# Altium PCB PCB1.PcbDoc (part 2 of 2)
Units mm, origin at the board's own origin, x right, y up, seen from the top; angles counter-clockwise.
Board outline 20 x 95 mm, 4 copper layers (Top Layer, Inner Layer 1, Inner Layer 2, Bottom Layer), stack 1.586 mm thick; 102 components, 66 nets, 399 pads, 49 vias.
Unrouted connection lines stored in the file: 134.
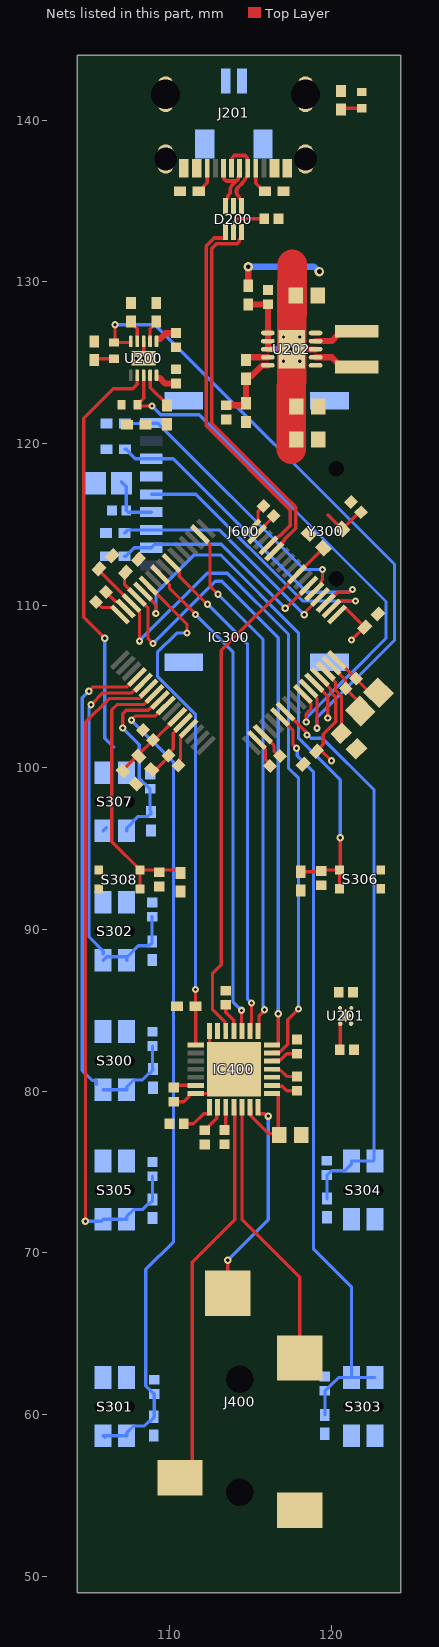
[diagram p3: the nets of this part, all layers, seen from the top]

## Part data (continued)
U202: library part CMP-0349-00001-1, "Buck-Boost Voltage Converter with 1.8 to 5.5 V Input and 1.2 to 5.5 V Output, -40 to 85 degC, 10-Pin SON (DRC), Green (RoHS & no Sb/Br)", Dynamic Voltage Scaling=TRUE, manufacturer="Texas Instruments", Switching Frequency(Max)(kHz)=1500, componentlink1description=Datasheet, componentlink1url=http://www.ti.com/general/docs/lit/getliterature.tsp?genericPartNumber=TPS63000&fileType=pdf, componentlink2description="Package Specification", componentlink2url=http://www.ti.com/litv/pdf/mpds117k, DatasheetVersion=SLVS520B, Eco-Plan="Green (RoHS & no Sb/Br)", Iout(Max)(A)=1.2, Iq(Typ)(mA)=0.04, Mounting Technology="Surface Mount", PackageDescription="10-Pin Plastic Small Outline No-Lead, 3 x 3 x 1 mm Body, 0.5 mm Pitch, Exposed Pad", PackageReference=DRC10-2400X1650TP, PackageVersion="revL, Sep-2011", PartNumber=TPS63000DRCRG4, Regulated Outputs(#)=1, SubFamily="Buck-Boost Regulator", Synchronous Rectification=TRUE, Topology=Buck-Boost, Vin(Max)(V)=5.5, Vin(Min)(V)=1.8, Vout(Max)(V)=5.5, Vout(Min)(V)=1.2
Y300: "22.5792 MHz XO (Standard) CMOS Oscillator 1.71V ~ 3.63V Enable/Disable 4-VLGA", Current Supply (Max)="1.3mA (Typ)", Frequency="22.5792 MHz", Frequency Stability=±25ppm, Operating Temperature="-40°C ~ 85°C", Package / Case=4-VLGA, Supplier Device Package="4-VLGA (2.5x2)", Voltage - Supply="1.71V ~ 3.63V", Base Resonator=MEMS, componentlink1description=Datasheet, componentlink1url=https://ww1.microchip.com/downloads/aemDocuments/documents/TCG/ProductDocuments/DataSheets/DSC60xxB-Ultra-Small-Ultra-Low-Power-MEMS-Oscillator-DS20006133.pdf, componentlink2description=DigiKey, componentlink2url=https://www.digikey.ca/en/products/detail/microchip-technology/DSC6001JI2B-022-5792T/22212139, Function=Enable/Disable, Height - Seated (Max)="0.035\" (0.89mm)", Mounting Type="Surface Mount", Output=CMOS, Size / Dimension="0.098\" L x 0.079\" W (2.50mm x 2.00mm)", Supplier 1=Avnet, Supplier Part Number 1=DSC6001JI2B-022.5792T, TYPE="XO (Standard)"

## Free pads (board coordinates)
  rrect100% 1x1.8 hole 1.4 slot 0.6 at 0 deg paste-2539.97 mask+0: 1(118.401,137.592) 2(109.761,137.592)
  rrect100% 1x2.2 hole 1.8 slot 0.6 at 0 deg paste-2539.97 mask+0: 3(118.401,141.592) 4(109.761,141.592)
  rect 0.6x1.15 smd paste+0 mask+0: A1-B12(117.281,137.017) A4-B9(116.481,137.017) B1-A12(110.881,137.017) B4-A9(111.681,137.017)
  rect 0.3x1.15 smd paste+0 mask+0: A5(115.331,137.017) A6(114.331,137.017) A7(113.831,137.017) A8(112.831,137.017) B5(112.331,137.017) B6(113.331,137.017) B7(114.831,137.017) B8(115.831,137.017)

## Via types
v1: diameter 0.45, hole 0.2, Top Layer to Bottom Layer, 42 vias
v2: diameter 0.5, hole 0.2, Top Layer to Bottom Layer, 5 vias
v3: diameter 0.6, hole 0.3, Top Layer to Bottom Layer, 2 vias

## Nets (pads, with @x,y where several pads share a name; then routed paths per layer and width w, separated by ;. In a path a pad name is that pad's centre, name@x,y a point inside that pad or via, vN(x,y) a via of type N, cw(c..) or ccw(c..) an arc to the next point about the centre after c; other vN are vias at no path point)
AGND: C203.1 C204.1 C404.2 C405.2 C406.2 C407.2 IC400.7 IC400.14 IC400.29 J400.1 NT400.2 U201.2 U201.5 | length 7.6
  Top Layer w0.2: C407.2@110.25,79.335 110.87,79.335 111.225,79.69 111.225,79.8 111.275,79.85 IC400.14@111.625,79.85 112.475,79.85 IC400.29@113.975,81.35 112.475,82.85 IC400.7@112.475,83.7
AVDD_3V: C204.2 C400.1 C406.1 IC400.17 IC400.26 U201.1 | length 4.8
  Top Layer w0.2: IC400.17@113.475,79 113.475,77.59 C406.1@113.525,77.54 ; IC400.26@116.325,81.85 116.375,81.9 116.855,81.9 117.255,82.3 C400.1@117.875,82.3 ; C204.2@120.52,82.55 120.555,82.585 U201.1@120.555,84.16
BOOT0: C313.1 IC300.60 R309.2 S306.1 S306.2 | length 34.1
  Top Layer w0.2: IC300.60@108.355,110.85 109.157,110.048 v1(109.157,109.505) ; R309.2@118.1,93.55 119.335,93.55 C313.1@119.375,93.59 119.44,93.655 S306.1@120.5,93.655 ; S306.2@120.5,92.495 S306.1@120.5,93.655 ; v1@120.6,95.7 v1(120.552,95.652) 120.552,93.707 S306.1@120.5,93.655
  Bottom Layer w0.2: v1(109.157,109.505) 109.157,110.757 111.525,113.125 113.15,113.125 117.975,108.3 117.975,101.8 120.552,99.223 v1(120.552,95.652)
C1N: C502.1 J500.4 | length 4.9
  Bottom Layer w0.2: J500.4@136.555,64.625 136.555,66.719 137.075,67.239 137.075,68.1 137.5,68.525 137.5,68.575 137.85,68.925 C502.1@137.9,68.925
C1P: C502.2 J500.3 | length 3.3
  Bottom Layer w0.2: J500.3@137.175,64.625 137.235,64.685 137.235,66.16 137.9,66.825 C502.2@137.9,67.575
C2N: C500.2 J500.2 | length 5.1
  Bottom Layer w0.2: J500.2@137.795,64.625 137.855,64.685 137.855,65.92 138.714,66.779 138.714,67.939 139.225,68.45 139.225,68.575 139.575,68.925 C500.2@139.625,68.925
C2P: C500.1 J500.1 | length 3
  Bottom Layer w0.2: J500.1@138.415,64.625 138.415,65.715 139.55,66.85 C500.1@139.55,67.15
CC1: pad.A5 R201.2 | length 1.7
  Top Layer w0.2: pad.A5@115.331,137.017 115.331,136.098 115.827,135.602 R201.2@115.902,135.602
CC2: pad.B5 R202.2 | length 1.7
  Top Layer w0.2: R202.2@111.802,135.602 111.877,135.602 112.077,135.802 112.077,135.877 112.331,136.131 pad.B5@112.331,137.017
CCW: C305.1 IC300.22 R303.1 S303.1 S303.3 | length 47.6
  Top Layer w0.2: IC300.22@116.823,103.109 117.625,102.307 117.625,101.426 117.848,101.203 v1(117.848,101.184)
  Bottom Layer w0.2: v1(117.848,101.184) 117.895,101.136 117.895,100.705 118.9,99.7 118.9,70.218 121.25,67.868 S303.1@121.25,62.3 ; R303.1@119.6,59.975 C305.1@119.6,61.475 119.62,61.475 119.998,61.853 120.004,61.853 120.45,62.3 S303.1@121.25,62.3 ; S303.3@122.7,62.3 S303.1@121.25,62.3
CLK_22_5792M: IC300.40 IC400.5 Y300.3 | length 32.7
  Top Layer w0.2: IC400.5@113.475,83.7 113.425,83.75 113.425,84.275 112.65,85.05 112.65,87.25 113.2,87.8 113.2,107.223 117.884,111.907 IC300.40@117.884,111.931 119.275,113.321 Y300.3@119.275,113.35
CW: C301.1 IC300.9 R301.1 S301.1 S301.3 | length 51.5
  Top Layer w0.2: v1@107.617,102.925 107.867,103.175 109.111,103.175 109.752,103.816 IC300.9@109.769,103.816
  Bottom Layer w0.2: S301.3@106,58.6 S301.3@105.9,58.7 S301.1@107.35,58.7 107.35,58.875 107.775,59.3 108.45,59.3 108.75,59.6 108.825,59.6 109.025,59.8 R301.1@109.025,59.875 109.05,59.9 C301.1@109.05,61.285 109.03,61.285 108.675,61.64 108.67,61.64 108.528,61.781 108.528,68.978 110.25,70.7 110.25,100.313 v1(107.644,102.919)
D_IN_N: D200.1 pad.A7 pad.B7 | length 5.1
  Top Layer w0.224: pad.A7@113.831,137.017 113.869,137.055 113.869,137.674 114,137.805 114.662,137.805 114.793,137.674 114.793,137.055 pad.B7@114.831,137.017 114.793,136.554 114.666,136.335 cw(c114.481,136.442) 114.653,136.316 114.502,136.111 cw(c114.04,136.452) 114.448,136.048 114.365,135.965 114.204,135.804 ccw(c114.362,135.646) 114.138,135.646 114.138,135.53 ccw(c114.362,135.53) 114.204,135.372 114.25,135.326 114.315,135.26 114.315,135.159 114.452,135.022 D200.1@114.452,134.677
D_IN_P: D200.3 pad.A6 pad.B6 | length 4.1
  Top Layer w0.224: pad.B6@113.331,137.017 113.369,136.979 113.369,136.36 113.5,136.229 114.101,136.229 ; D200.3@113.452,134.677 113.452,135.022 113.589,135.159 113.589,135.26 113.746,135.488 113.746,135.558 ; 113.746,135.559 113.744,135.592 cw(c114.265,135.623) 113.896,135.992 114.117,136.213 114.198,136.294 ccw(c114.04,136.452) 114.258,136.402 114.293,136.554 pad.A6@114.331,137.017
DGND: C200.2 C201.1 C202.1 C209.1 C300.2 C301.2 C302.1 C303.2 C304.2 C305.2 C306.1 C307.2 C308.2 C309.2 C310.1 C311.1 C312.2 C313.2 C314.1 C315.2 C316.2 C317.2 C400.2 C402.2 C403.2 C501.2 C503.2 C504.1 C505.2 C600.1 C601.2 D200.2 D201.C IC300.12 IC300.18 IC300.31 IC300.47 IC300.63 IC400.6 IC400.24 J201.2 J201.3 J201.4 J500.7 J600.6 J600.10 J600.11 J600.12 J600.13 NT200.2 NT400.1 pad.1 pad.2 pad.3 pad.4 pad.A1-B12 pad.B1-A12 R201.1 R202.1 R203.1 R205.1 R206.1 R210.1 R305.1 R309.1 R502.1 S300.2 S300.4 S301.2 S301.4 S302.2 S302.4 S303.2 S303.4 S304.2 S304.4 S305.2 S305.4 S307.2 S307.4 S308.1 S308.2 U200.3 U200.11 U202.9 Y300.2 | length 15.2
  Top Layer w0.2: C302.1@105.95,110.725 106.175,110.725 106.675,110.225 106.879,110.225 IC300.63@107.295,109.809 ; v1(108.4,125.275) U200.3@108.4,126.325 ; R305.1@108.982,99.918 109.21,99.918 109.939,100.647 109.939,100.875 110.225,101.161 110.225,102.11 110.83,102.716 IC300.12@110.83,102.755 ; C403.2@113.415,86.265 C403.2@113.475,86.205 ; IC300.18@115.409,101.695 115.409,101.624 115.925,101.108 115.925,100.508 116.199,100.234 C311.1@116.199,100.071 ; IC300.47@115.409,114.405 115.409,114.459 116.486,115.536 C303.2@116.486,115.589 ; IC300.31@120.005,106.291 120.875,105.421 120.875,104.878 C309.2@120.889,104.864 121.784,103.968 C310.1@121.784,103.484
  Top Layer w0.381: R210.1@114.724,125.166 114.898,125.34 U202.9@116.075,125.34 ; R201.1@117.052,135.602 R201.1@117.127,135.602
  other v1: 107.925,125.275 108.875,125.275
DVDD_3V3: C203.2 C206.1 C207.2 C208.2 C302.2 C303.1 C307.1 C309.1 C310.2 C311.2 C314.2 C316.1 C403.1 C501.1 C503.1 C600.2 C601.1 IC300.13 IC300.19 IC300.30 IC300.32 IC300.48 IC300.64 IC400.4 J500.5 J500.8 J600.4 R204.1 R207.1 R209.2 R300.2 R301.2 R302.2 R303.2 R306.2 R307.2 R308.2 R310.2 R400.1 R401.2 R402.2 R500.1 R501.1 R600.2 R601.2 R602.2 R603.2 S306.3 S306.4 U201.3 U201.4 U202.1 Y300.1 Y300.4 | length 30.3
  Top Layer w0.2: C302.2@105.328,110.103 105.464,110.103 105.611,110.103 105.842,109.871 106.526,109.871 IC300.64@106.941,109.456 ; C307.1@110.561,100.114 110.561,100.397 110.668,100.504 110.668,100.557 110.686,100.575 110.686,101.833 111.184,102.331 IC300.13@111.184,102.402 ; C403.1@113.475,85.568 C403.1@113.475,85.325 113.475,84.875 113.975,84.375 IC400.4@113.975,83.7 ; IC300.48@115.056,114.759 115.471,115.174 115.471,115.818 C303.1@115.864,116.211 ; IC300.19@115.763,102.048 116.45,101.361 116.45,101.033 116.79,100.693 C311.2@116.821,100.693 ; IC300.30@119.652,105.937 119.652,105.866 120.249,105.27 120.249,104.779 120.628,104.4 120.628,103.436 120.633,103.431 120.633,102.313 C314.2@120.558,102.238 ; Y300.1@119.783,115.601 Y300.4@120.667,114.717 C316.1@121.775,115.825 ; IC300.32@120.359,106.644 122.388,104.616 C310.2@122.916,104.616
  Bottom Layer w0.2: C600.2@107.025,117.65 107.33,117.345 C601.1@107.33,115.875 107.435,115.77 J600.4@108.88,115.77 ; J500.8@134.055,64.35 134.055,67.205 134.275,67.425 C501.1@134.305,67.425 ; J500.5@135.935,64.625 135.935,66.91 136.2,67.175 C503.1@136.2,67.65
HOME: C315.1 IC300.8 R308.1 S307.1 S307.3 | length 11.9
  Top Layer w0.2: v1(107.105,102.43) 107.105,103.305 107.322,103.522 108.698,103.522 109.345,104.169 IC300.8@109.416,104.169
  Bottom Layer w0.2: S307.3@105.9,96.075 S307.3@106.1,96.275 ; v1(107.105,102.43) 108.125,101.409 108.125,99.325 108.42,99.03 108.425,99.03 108.78,98.675 C315.1@108.8,98.675 108.8,97.303 R308.1@108.858,97.244 108.858,97.169 108.658,96.969 108.069,96.969 107.35,96.25 S307.1@107.35,96.075
HPLEFT: IC400.19 J400.2 | length 17
  Top Layer w0.2: IC400.19@114.475,79 114.475,72.075 118.05,68.5 J400.2@118.05,63.5
HPRIGHT: IC400.18 J400.3 | length 23.3
  Top Layer w0.2: J400.3@111.4,56.85 111.4,69.425 114.025,72.05 114.025,78.95 IC400.18@113.975,79
HPSENSE: IC400.21 J400.4 | length 13
  Top Layer w0.2: J400.4@113.6,67.5 v1(113.6,69.55) ; IC400.21@115.475,79 115.475,78.65 115.525,78.6 115.882,78.6 116.032,78.45 v1(116.1,78.45)
  Bottom Layer w0.2: v1(113.6,69.55) 116.1,72.05 v1(116.1,78.45)
IREF: J500.12 R502.2 | length 3.2
  Bottom Layer w0.2: J500.12@131.575,64.895 131.575,65.44 132.825,66.69 132.825,67.275 R502.2@133.025,67.475
MODE: C317.1 IC300.23 R310.1 S304.1 S304.3 | length 35.3
  Top Layer w0.2: IC300.23@117.177,103.462 117.177,103.434 118.5,102.111 v1(118.5,102)
  Bottom Layer w0.2: v1(118.5,102) 118.542,102 118.742,101.8 119.45,101.8 122.635,98.615 122.635,75.71 122.6,75.675 S304.1@121.25,75.675 121.25,75.5 120.825,75.075 120.01,75.075 119.745,74.81 C317.1@119.725,74.81 R310.1@119.725,73.35
NetC206_2: C206.2 R209.1 R210.2 U202.10 | length 4.5
  Top Layer w0.381: C206.2@113.528,122.372 114.615,122.372 114.724,122.482 R209.1@114.724,122.499 114.724,124.091 114.834,124.201 115.081,124.201 115.72,124.84 U202.10@116.075,124.84
NetC209_2: C209.2 R208.1 U202.6 U202.7 U202.8 | length 4
  Top Layer w0.381: R208.1@114.86,128.605 114.865,128.61 C209.2@116.08,128.61 ; U202.8@116.075,125.84 116.08,125.845 C209.2@116.08,128.61 ; C209.2@116.08,128.61 C209.2@116.085,128.615 C209.2@116.08,128.61
NetC306_2: C306.2 IC300.11 R304.1 R305.2 | length 4.8
  Top Layer w0.2: R304.1@107.118,99.782 107.118,99.821 108.11,100.813 C306.2@108.986,101.689 ; C306.2@109.009,101.641 IC300.11@110.477,103.109
NetC401_1: C401.1 IC400.25 | length 1.7
  Top Layer w0.2: IC400.25@116.325,81.35 116.375,81.3 116.855,81.3 117.255,80.9 C401.1@117.875,80.9
NetC401_2: C401.2 IC400.23 | length 1.7
  Top Layer w0.2: IC400.23@116.325,80.35 116.375,80.3 116.975,80.3 117.255,80.02 C401.2@117.875,80.02
NetC402_1: C402.1 IC400.20 IC400.22 | length 5.6
  Top Layer w0.2: IC400.20@114.975,79 115.025,78.95 115.025,78.475 116.13,77.37 116.695,77.37 116.725,77.34 116.725,79.8 116.675,79.85 IC400.22@116.325,79.85
NetC404_1: C404.1 IC400.15 | length 2.2
  Top Layer w0.2: C404.1@110.88,77.975 111.48,77.975 112.105,78.6 112.425,78.6 112.475,78.65 IC400.15@112.475,79
NetC405_1: C405.1 IC400.16 | length 1.8
  Top Layer w0.2: C405.1@112.175,77.58 112.195,77.58 112.395,77.78 112.395,77.8 112.925,78.33 112.925,78.95 IC400.16@112.975,79
NetC407_1: C407.1 IC400.13 | length 1.4
  Top Layer w0.2: C407.1@110.25,80.215 110.385,80.35 IC400.13@111.625,80.35
NetD201_A: D201.A R200.2 | length 1.3
  Top Layer w0.2: R200.2@120.6,140.65 120.675,140.725 D201.A@121.875,140.725
NetD202_A: D202.A R204.2 | length 0.1
  Top Layer w0.2: R204.2@107.35,121.175 R204.2@107.425,121.1
NetD202_C: D202.C IC300.26 U200.8 | length 33.9
  Top Layer w0.2: D202.C@108,122.4 108.4,122.8 U200.8@108.4,124.225 ; D202.C@108.025,122.4 108.091,122.334 v1(108.912,122.334) ; IC300.26@118.238,104.523 118.238,104.452 118.737,103.953 118.737,103.587 118.45,103.3 v1(118.45,102.8)
  Bottom Layer w0.2: v1(108.912,122.334) 109.464,121.782 111.843,121.782 123.375,110.25 123.375,107.975 121.282,105.882 121.282,105.866 121.164,105.748 121.148,105.748 118.496,103.096 118.496,102.846 v1(118.45,102.8)
NetD203_A: D203.A R207.2 | length 1.3
  Top Layer w0.2: R207.2@105.35,125.175 105.425,125.25 D203.A@106.575,125.25
NetD203_C: D203.C IC300.27 U200.5 | length 40.4
  Top Layer w0.2: v1(106.625,127.35) 106.625,126.3 D203.C@106.575,126.25 107.585,126.25 107.6,126.265 U200.5@107.6,126.325 ; IC300.27@118.591,104.877 118.591,104.806 119.11,104.287 v1(119.11,102.425)
  Bottom Layer w0.2: v1(106.625,127.35) 109.1,127.35 123.9,112.55 123.9,107.85 119.11,103.06 v1(119.11,102.425)
NetIC300_28: IC300.28 J500.9 | length 2.5
  Top Layer w0.2: IC300.28@118.945,105.23 119.775,104.4 v1(119.775,103.05)
NetIC300_29: IC300.29 J500.10 R500.2 | length 6.7
  Top Layer w0.2: IC300.29@119.298,105.584 119.298,105.513 119.947,104.864 119.947,104.654 120.275,104.326 120.275,102.825 119.5,102.05 119.5,101.425 R500.2@119.075,101 119.344,101 119.372,101.028 119.386,101.028 v1(120.007,100.407)
NetIC300_33: IC300.33 J500.11 R501.2 | length 3.5
  Top Layer w0.2: IC300.33@120.359,109.456 120.774,109.871 120.845,109.871 121.379,109.337 121.386,109.337 R501.2@122.062,108.662 122.049,108.662 121.263,107.875 v1(121.25,107.875)
NetIC300_34: IC300.34 J600.5 | length 17.1
  Top Layer w0.2: IC300.34@120.005,109.782 IC300.34@120.005,109.809 120.076,109.809 120.552,110.285 v1(121.494,110.285)
  Bottom Layer w0.2: J600.5@108.88,116.87 111.63,116.87 118.215,110.285 v1(121.494,110.285)
NetIC300_35: IC300.35 J600.7 R602.1 | length 19.8
  Top Layer w0.2: IC300.35@119.652,110.163 119.723,110.163 120.385,110.825 121.071,110.825 121.236,110.991 v1(121.304,110.991)
  Bottom Layer w0.2: R602.1@107.25,119.65 107.325,119.65 107.739,119.236 107.739,119.211 107.88,119.07 J600.7@108.88,119.07 110.23,119.07 118.475,110.825 121.096,110.825 121.262,110.991 v1(121.304,110.991)
NetIC300_36: IC300.36 J600.3 R601.1 | length 14.8
  Top Layer w0.2: v1(118.325,109.425) 118.373,109.473 118.373,109.591 IC300.36@119.298,110.516
  Bottom Layer w0.2: R601.1@107.225,114.475 107.42,114.67 J600.3@108.88,114.67 113.08,114.67 v1(118.325,109.425)
NetIC300_37: IC300.37 J600.9 R603.1 | length 17.5
  Top Layer w0.2: IC300.37@118.945,110.87 119.36,111.285 119.36,111.495 119.45,111.585 v1(119.45,112.225)
  Bottom Layer w0.2: R603.1@107.25,121.25 108.86,121.25 J600.9@108.88,121.27 109.27,121.27 118.315,112.225 v1(119.45,112.225)
NetIC300_38: IC300.38 J600.2 R600.1 | length 14
  Top Layer w0.2: v1@117.025,109.775 117.093,109.775 117.205,109.887 117.255,109.887 IC300.38@118.591,111.223
  Bottom Layer w0.2: R600.1@107.225,113.05 107.3,113.05 107.82,113.57 J600.2@108.88,113.57 109.09,113.78 113.2,113.78 v1(117.149,109.831)
NetIC300_50: IC300.50 IC400.1 | length 32.5
  Top Layer w0.2: IC300.50@111.891,114.405 111.891,114.37 112.5,113.761 112.5,111.186 v1(112.994,110.692) ; IC400.1@115.475,83.7 115.525,83.75 115.525,84.633 115.875,84.983 v1(115.875,85.025)
  Bottom Layer w0.2: v1(112.994,110.692) 115.775,107.911 115.775,85.267 115.827,85.215 115.827,85.073 v1(115.875,85.025)
NetIC300_55: IC300.55 IC400.2 | length 31
  Top Layer w0.2: IC300.55@110.123,112.638 110.123,112.567 110.599,112.091 110.599,111.801 v1@112.338,110.063 ; IC400.2@114.975,83.7 115.025,83.75 115.025,84.181 115.061,84.217 v1(115.061,85.434)
  Bottom Layer w0.2: v1(112.35,110.075) 114.825,107.6 114.825,85.671 v1(115.061,85.434)
NetIC300_57: IC300.57 IC400.3 | length 30.3
  Top Layer w0.2: IC300.57@109.416,111.931 109.416,111.87 110,111.286 110,111.075 v1@111.615,109.46 ; v1@114.441,84.96 114.441,83.734 IC400.3@114.475,83.7
  Bottom Layer w0.2: v1(111.6,109.45) 113.925,107.125 113.925,85.499 v1(114.441,84.983)
NetIC300_59: IC300.59 IC400.8 R402.1 | length 31.4
  Top Layer w0.2: IC300.59@108.709,111.223 111.075,108.857 v1(111.075,108.3) ; R402.1@111.6,85.255 v1(111.6,86.275) ; IC400.8@111.625,82.85 R402.1@111.625,85.241
  Bottom Layer w0.2: v1(111.075,108.3) 110.45,108.3 109.25,107.1 109.25,105.625 111.6,103.275 v1(111.6,86.275)
NetIC300_61: IC300.61 IC400.28 R401.1 | length 41.4
  Top Layer w0.2: R401.1@107.275,112.05 107.222,111.997 107.222,111.296 IC300.61@108.002,110.516 108.675,109.843 108.675,107.95 v1(108.975,107.65) ; IC400.28@116.325,82.85 116.675,82.85 116.725,82.9 v1@116.725,84.757
  Bottom Layer w0.2: v1(108.975,107.65) 112.825,111.5 113.225,111.5 116.725,108 v1(116.725,84.775)
NetIC300_62: IC300.62 IC400.27 R400.2 | length 45.4
  Top Layer w0.2: R400.2@105.647,112.272 R400.2@105.722,112.347 ; R400.2@105.722,112.372 R400.2@105.722,112.347 ; R400.2@105.765,112.39 R400.2@105.722,112.347 ; v1@108.138,107.761 108.138,109.603 107.648,110.092 IC300.62@107.648,110.163 105.722,112.089 R400.2@105.722,112.347 ; IC400.27@116.325,82.35 116.375,82.4 116.81,82.4 117.3,82.89 117.3,84.4 v1(117.975,85.075)
  Bottom Layer w0.2: v1@108.138,107.812 112.325,112 113.575,112 117.35,108.225 117.35,99.95 117.975,99.325 v1(117.975,85.075)
  other v1: 108.15,107.8
NetL200_1: L200.1 U202.4 | length 2.8
  Top Layer w0.381: U202.4@119.025,126.34 120.022,126.34 120.406,126.724 120.406,126.739 120.615,126.948 L200.1@121.565,126.948
NetL200_2: L200.2 U202.2 | length 2.8
  Top Layer w0.381: U202.2@119.025,125.34 120.023,125.34 120.615,124.748 L200.2@121.565,124.748
NetR203_2: R203.2 U200.2 | length 1.4
  Top Layer w0.2: U200.2@108.8,126.325 108.8,127.1 109.175,127.475 R203.2@109.175,127.55
NetR205_2: R205.2 U200.4 | length 1.4
  Top Layer w0.2: R205.2@107.625,127.55 107.625,127.475 108,127.1 U200.4@108,126.325
NetR206_2: R206.2 U200.9 | length 2.3
  Top Layer w0.2: U200.9@108.8,124.225 108.815,124.21 108.815,123.46 109.85,122.425 R206.2@109.85,122.35
NRST: C312.1 IC300.7 R307.1 S308.3 S308.4 | length 17.4
  Top Layer w0.2: S308.4@108.175,92.49 S308.3@108.175,93.65 ; IC300.7@109.062,104.523 109.055,104.523 108.418,103.885 106.76,103.885 106.425,103.55 106.425,95.41 108.175,93.66 S308.3@108.175,93.65 ; R307.1@110.625,93.425 110.625,93.5 110.475,93.65 S308.3@108.175,93.65
PGND: C205.1 C207.1 C208.1 NT200.1 U202.3 U202.11 | length 14.7
  Top Layer w0.381: U202.11@116.916,125.34 117.05,125.206 v2(117.05,125.09) ; v2(117.55,125.84) 117.56,125.83 U202.3@119.025,125.83
  Top Layer w1.83: 117.515,119.656 117.529,122.294 117.543,125.087 117.543,125.093 117.547,125.84 117.551,126.587 117.551,126.593 117.565,129.151 117.575,131.08
  Inner Layer 1 w0.381: 116.063,125.85 117.54,125.85 v2(117.55,125.84)
  other v2: 118.05,125.09 117.05,126.59 118.05,126.59
PLAY: C308.1 IC300.6 R306.1 S305.1 S305.3 | length 41.9
  Top Layer w0.2: v1(104.8,71.95) 104.8,102.775 106.275,104.25 108.15,104.25 108.709,104.809 IC300.6@108.709,104.877
  Bottom Layer w0.2: v1(104.8,71.95) 105.775,71.95 S305.3@105.9,72.075 S305.1@107.35,72.075 107.35,72.25 107.775,72.675 108.325,72.675 108.675,73.025 108.75,73.025 108.95,73.225 R306.1@108.95,73.3 C308.1@108.95,74.735
USB_D_N: D200.6 IC300.44 | length 23.9
  Top Layer w0.224: D200.6@114.452,133.067 114.452,132.722 114.315,132.585 114.315,132.484 114.19,132.359 112.904,132.359 112.611,132.066 112.611,121.264 117.283,116.592 117.697,116.178 117.8,116.075 117.8,114.78 117.079,114.06 117.079,114.008 116.47,113.399 IC300.44@116.47,113.345
USB_D_P: D200.4 IC300.45 | length 23
  Top Layer w0.224: D200.4@113.452,133.067 113.452,132.747 113.414,132.709 112.759,132.709 112.26,132.211 112.26,121.119 117.449,115.93 117.449,114.926 116.831,114.308 116.78,114.308 116.17,113.698 IC300.45@116.116,113.698
VBAT: C202.2 C205.2 J201.1 R208.2 R304.2 U200.7 U200.10 U202.5 | length 32.7
  Top Layer w0.2: v1(106,107.975) 104.7,109.275 104.7,121.575 106.525,123.4 107.725,123.4 108,123.675 U200.7@108,124.225
  Top Layer w0.381: U200.10@109.275,124.065 109.385,124.065 109.732,123.718 C202.2@110.357,123.718 ; R208.2@114.86,129.755 v3(114.86,130.93)
  Bottom Layer w0.2: v1(106,107.975) 106,101.8 106.55,101.25
  Bottom Layer w0.381: v3(114.86,130.93) 118.927,130.93 119.227,130.63 v3(119.26,130.63)
VBUS: C200.1 C201.2 D200.5 pad.A4-B9 pad.B4-A9 R200.1 U200.1 | length 3.8
  Top Layer w0.2: D200.5@113.952,133.067 114.002,133.117 114.002,133.677 114.227,133.902 C200.1@115.847,133.902
  Top Layer w0.381: U200.1@109.275,126.485 109.42,126.485 109.755,126.819 110.394,126.819 C201.2@110.4,126.825
VCC: C505.1 J500.14 | length 3.4
  Bottom Layer w0.2: C505.1@129.4,67.625 129.4,66.675 130.313,65.762 130.313,64.667 J500.14@130.355,64.625
VCOMH: C504.2 J500.13 | length 3.6
  Bottom Layer w0.2: J500.13@130.955,64.35 130.955,67.43 C504.2@131.3,67.775
VOL+: C300.1 IC300.4 R300.1 S300.1 S300.3 | length 33.5
  Top Layer w0.2: v1(105.017,104.704) 105.284,104.97 107.357,104.97 107.971,105.584 IC300.4@108.002,105.584
  Bottom Layer w0.2: v1(105.017,104.704) 104.614,104.3 104.614,81.261 105.225,80.65 105.475,80.65 S300.3@105.475,80.4 ; S300.3@105.9,80.075 S300.1@107.35,80.075 107.35,80.25 107.775,80.675 108.3,80.675 108.7,81.075 108.775,81.075 108.975,81.275 R300.1@108.975,81.35 108.95,81.375 C300.1@108.95,82.785
VOL-: C304.1 IC300.5 R302.1 S302.1 S302.3 | length 24.9
  Top Layer w0.2: v1(105.15,103.875) 105.875,104.6 107.678,104.6 108.308,105.23 IC300.5@108.355,105.23
  Bottom Layer w0.2: v1(105.15,103.875) 105.15,103.807 105.025,103.682 105.025,89.525 105.9,88.65 S302.3@105.9,88.475 ; S302.3@105.9,88.075 106.125,88.3 S302.1@107.35,88.3 ; S302.1@107.35,88.075 107.35,88.25 108.075,88.975 108.725,88.975 108.925,89.175 R302.1@108.925,89.25 C304.1@108.925,90.775
pads on no net: IC300.1 IC300.2 IC300.3 IC300.10 IC300.14 IC300.15 IC300.16 IC300.17 IC300.20 IC300.21 IC300.24 IC300.25 IC300.39 IC300.41 IC300.42 IC300.43 IC300.46 IC300.49 IC300.51 IC300.52 IC300.53 IC300.54 IC300.56 IC300.58 IC400.9 IC400.10 IC400.11 IC400.12 J400.MH1 J400.MH2 J500.6 J600.1 J600.8 J600.14 J600.15 S300.5 S300.6 S301.5 S301.6 S302.5 S302.6 S303.5 S303.6 S304.5 S304.6 S305.5 S305.6 S307.5 S307.6 U200.6
copper on no net: | length 8.2
  Top Layer w0.2: v1(104.961,106.396) 105.557,105.8 106.733,105.8 107.224,106.291 107.295,106.291 ; v1(104.99,105.539) 105.058,105.539 105.221,105.375 107.015,105.375 107.577,105.937 107.648,105.937 ; v1@105.272,107.228 105.272,106.878 105.9,106.25 106.434,106.25 106.455,106.229 106.526,106.229 106.941,106.644
  other v1: 105.258,107.31

## Polygon pours and split planes (outlines as drawn)
NetL200_1 on Top Layer "NONET_L-01_P-001" (solid, shelved, pour order 0): 119.615,125.975 119.435,126.155 119.435,126.53 119.615,126.73 119.615,127.626 123.335,127.626 123.335,125.975
NetL200_2 on Top Layer "NONET_L-01_P-001" (solid, shelved, pour order 1): 123.335,125.78 123.335,124.08 119.61,124.08 119.61,124.93 119.435,125.155 119.435,125.53 119.61,125.755
DVDD_3V3 on Top Layer "NONET_L-01_P-001" (solid, shelved, pour order 2): 118.585,125.13 119.985,125.13 119.985,118.78 118.585,118.78
VBAT on Top Layer "NONET_L-01_P-001" (solid, shelved, pour order 5): 118.535,131.305 119.935,131.305 119.935,126.28 118.535,126.28
DGND on Inner Layer 1 "NONET_L-01_P-001" (solid, shelved, pour order 7): 104.3,144 124.3,144 124.3,81.375 104.3,81.375
PGND on Inner Layer 1 "NONET_L-01_P-001" (solid, shelved, pour order 6): 116.625,132.25 116.625,118.375 124.3,118.375 124.3,132.25
AGND on Inner Layer 1 "NONET_L-01_P-001" (solid, shelved, pour order 8): 104.3,82.55 124.3,82.55 124.3,49 104.3,49

## Other copper
Top Layer:
  region net DVDD_3V3: 120.313,115.565 119.839,116.039 119.656,116.039 119.253,115.636 119.818,115.07

## Silkscreen, mask and mechanical layers (free items; w line width, h text height)
Top Overlay:
  lines w0.2: 109.511,138.867 109.511,140.117 ; 109.511,143.067 109.511,143.792 118.651,143.792 118.651,143.067 ; 118.651,138.867 118.651,140.117
  lines w0.254: 188.875,45.425 208.875,45.425 208.875,95.425 188.875,95.425 188.875,45.425
Bottom Overlay:
  text "HOME" at 108.675,100.692 h1.5
  text "VOL-" at 108.049,92.667 h1.5
  text "VOL+" at 108.324,84.692 h1.5
  text "PLAY" at 108.075,76.725 h1.5
  text "MODE" at 123.75,76.617 h1.5
  text "CW" at 109.05,63.342 h1.5
  text "CCW" at 123.75,63.317 h1.5
Mechanical 1:
  the board outline again, w0.254
Top 3D Body:
  lines w0.2: 109.511,137.092 109.511,143.792 118.651,143.792 118.651,137.092 109.511,137.092
Top Courtyard:
  lines w0.2: 109.161,136.342 119.001,136.342 119.001,143.892 109.161,143.892 109.161,136.342
Top Assembly:
  lines w0.2: 109.161,136.342 109.161,143.892 119.001,143.892 119.001,136.342 109.161,136.342
Top Component Center:
  lines w0.1: 113.581,140.442 114.581,140.442 ; 114.081,139.942 114.081,140.942